# Altium PCB OFP_MCM_v1.5.PcbDoc (part 5 of 8)
Units mm, origin at the board's own origin, x right, y up, seen from the top; angles counter-clockwise.
Board outline 110 x 120 mm, 4 copper layers (Top Layer, Layer 1, Layer 2, Bottom Layer), stack 1.576 mm thick; 353 components, 268 nets, 1240 pads, 519 vias.
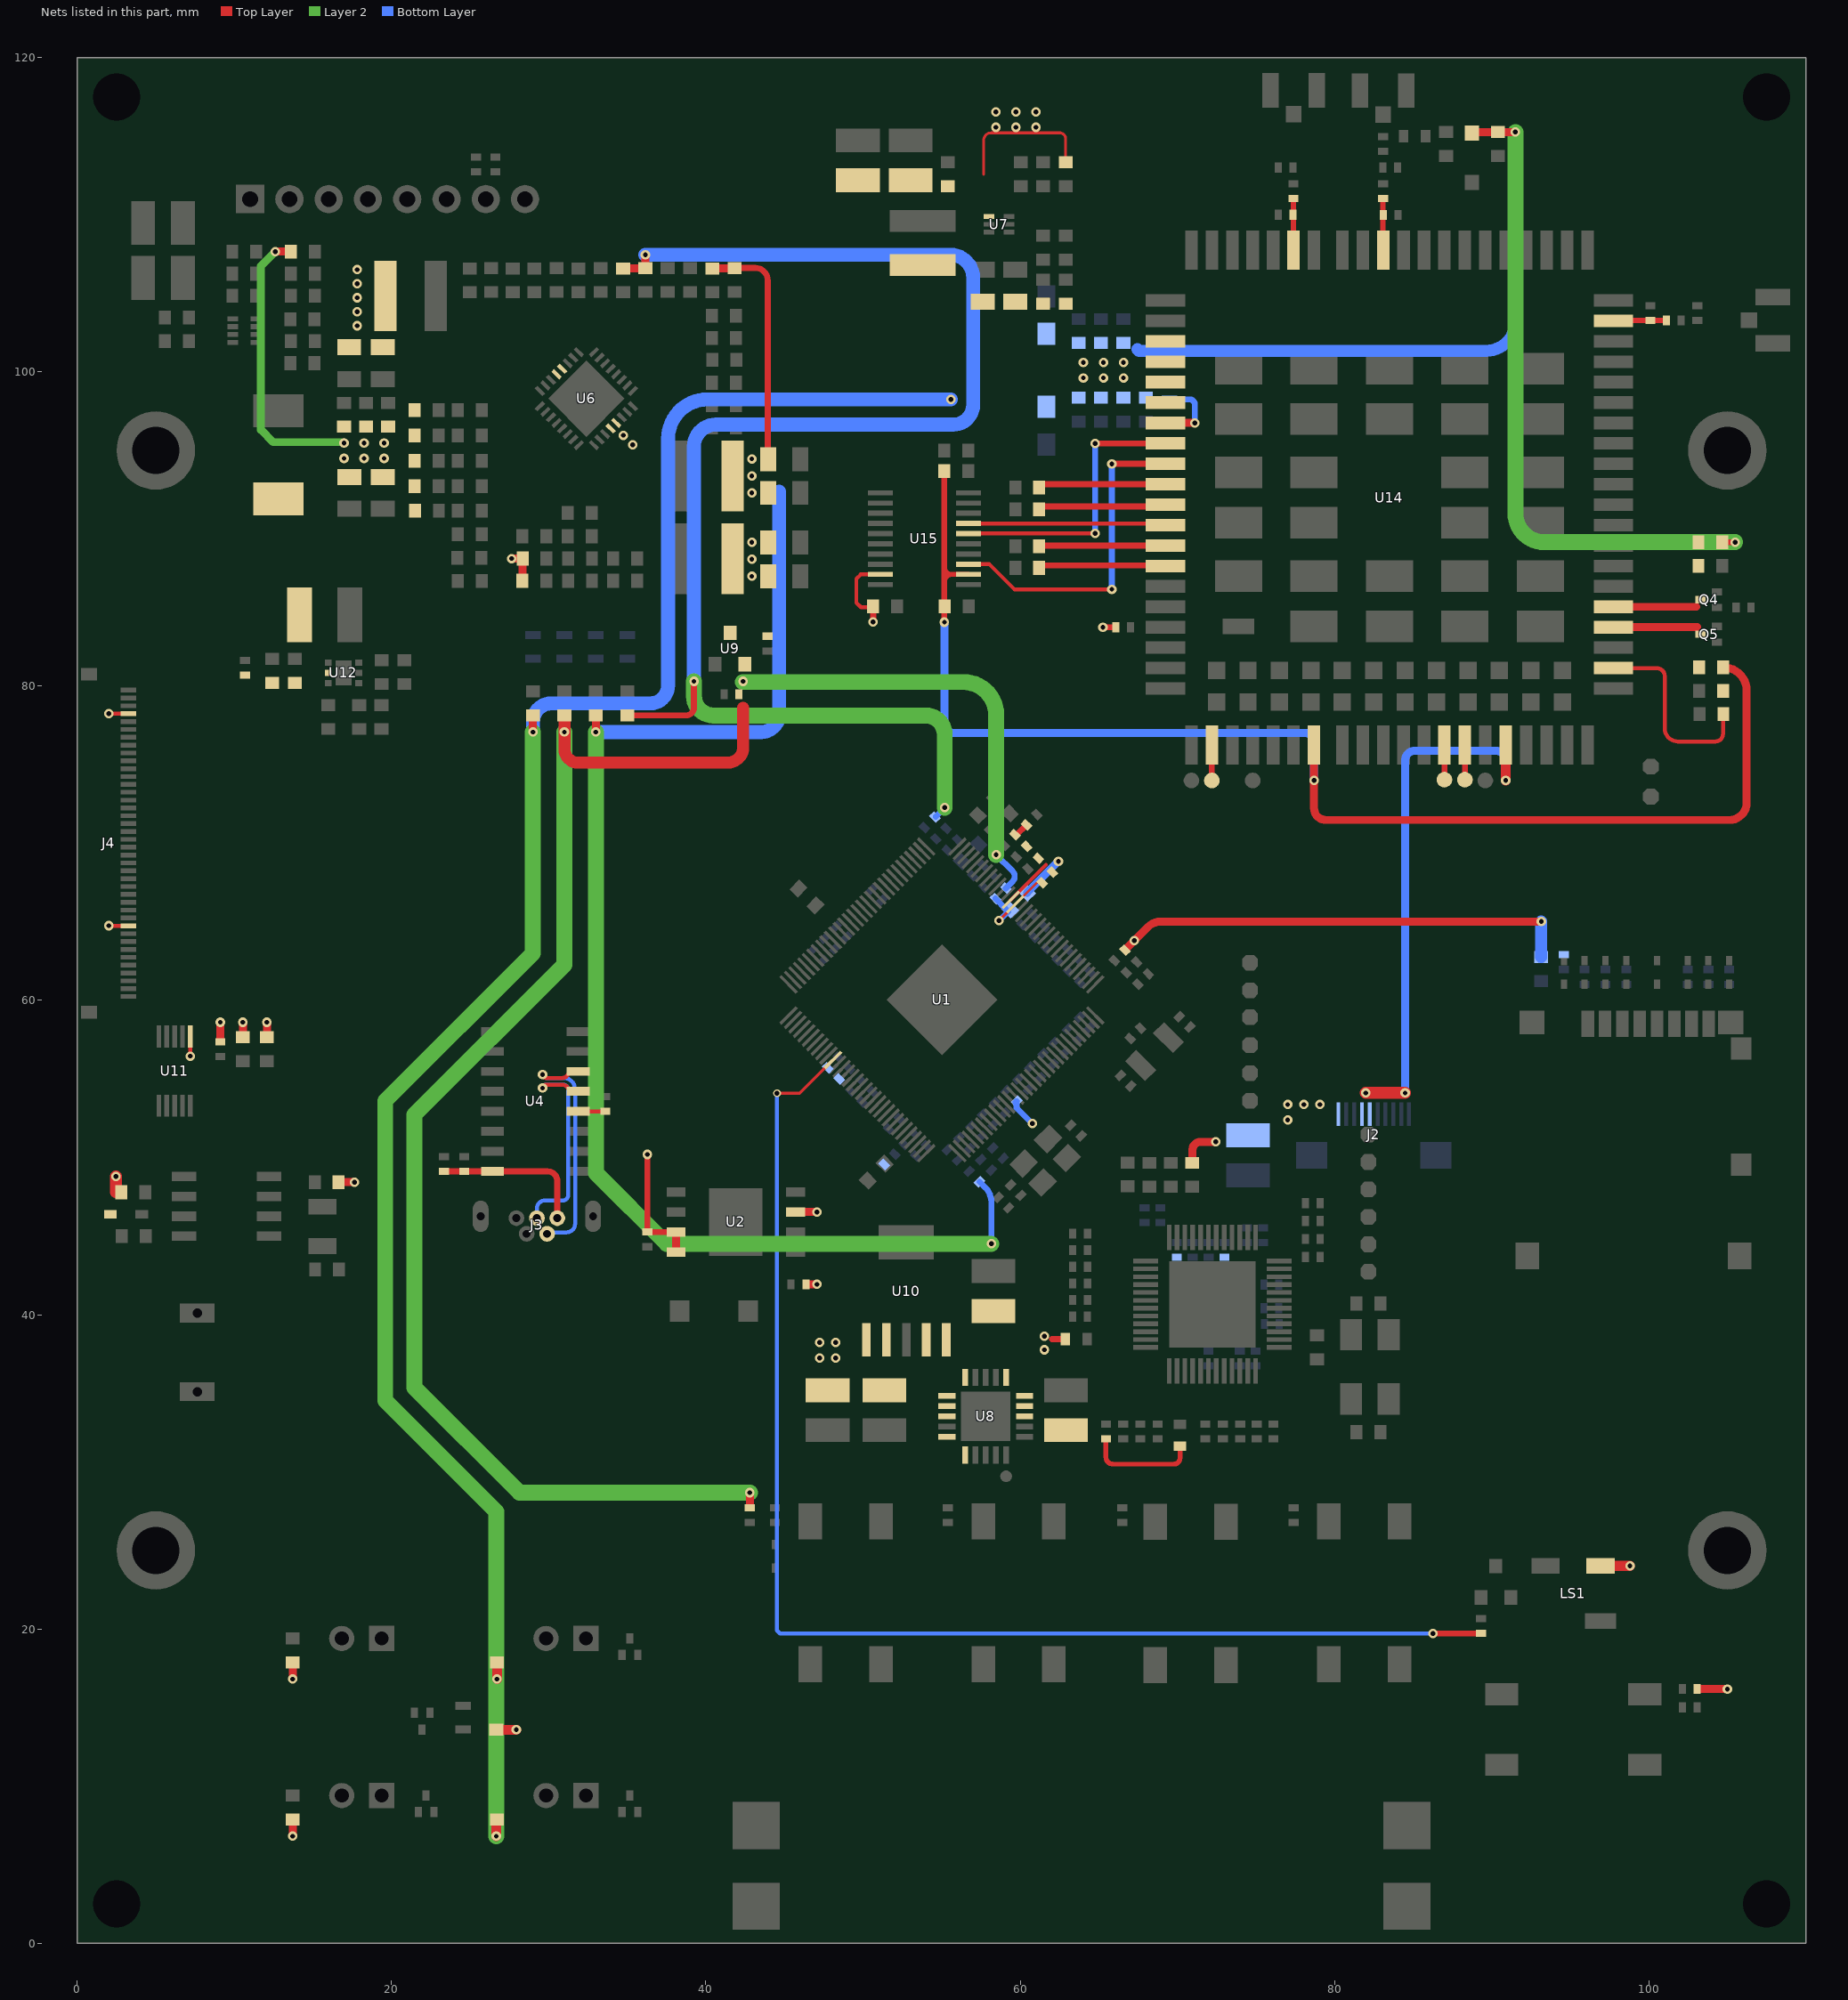
[diagram p4: the nets of this part, all layers, seen from the top]

## Part data (continued)
R74 R75 R76: library part RC0603FR-0751KL, "RES 51K OHM 1% 1/10W 0603", Case Code (Imperial)=0603, Case Code (Metric)=1608, LCSC Part Number=C107231, Manufacturer=Yageo, Max Operating Temperature=155°C, Max Power Dissipation=100mW, Min Operating Temperature=-55°C, Package Quantity=1, Resistance Tolerance=1%, Resistor Type="Thick Film", Temperature Coefficient=100ppm/°C, Voltage Rating=50V, Case/Package=0603, ComponentLink1Description=https://datasheet.ciiva.com/11819/0900766b80f96399-11819378.pdf?src-supplier=Rs, ComponentLink1URL=https://datasheet.ciiva.com/11819/0900766b80f96399-11819378.pdf?src-supplier=Rs, ComponentLink2Description=https://datasheet.ciiva.com/46395/443971-46395014.pdf?src-supplier=Element14, ComponentLink2URL=https://datasheet.ciiva.com/46395/443971-46395014.pdf?src-supplier=Element14, ComponentLink3Description=https://datasheet.ciiva.com/2454/pyu-r-int-thick-7-2454124.pdf?src-supplier=Digikey, ComponentLink3URL=https://datasheet.ciiva.com/2454/pyu-r-int-thick-7-2454124.pdf?src-supplier=Digikey, ComponentLink4Description=https://datasheet.ciiva.com/2454/pyu-r-int-thick-7-2454125.pdf?src-supplier=Digikey, ComponentLink4URL=https://datasheet.ciiva.com/2454/pyu-r-int-thick-7-2454125.pdf?src-supplier=Digikey, ComponentLink5Description=https://datasheet.ciiva.com/2454/pyu-r-int-thick-7-2454123.pdf?src-supplier=Digikey, ComponentLink5URL=https://datasheet.ciiva.com/2454/pyu-r-int-thick-7-2454123.pdf?src-supplier=Digikey, ComponentLink6Description=https://datasheet.ciiva.com/12558/rc0603-272842-12558554.pdf?src-supplier=Mouser, ComponentLink6URL=https://datasheet.ciiva.com/12558/rc0603-272842-12558554.pdf?src-supplier=Mouser, Depth=0.8mm, Features="Moisture Resistant", Height=0.45mm, Item Type=Resistors, Lead Free=5697LeadFree, Length=1.6mm, Manufacturer Part Number=RC0603FR-0751KL, Number of Terminations=2, Packaging="Tape and Reel", Pins=2NUMBER, Power Rating=100mW, Pricing="5000=0.0024, 50000=0.0023, 150000=0.0022, 375000=0.0021, 1000000=0.002 (USD)", Reach SVHC Compliant=No, RoHS=Yes, RoHS Compliant=Yes, Series=RC, Stock=1155000, Supplier="Future Electronics", Technology="THICK FILM", Termination=SMD/SMT, Tolerance=1%, Voltage Rating (DC)=50V, Width=0.031inch
R77 R97 R98 R99 R114 R120 R121: library part RC0603FR-07680RL, "RES SMD 680 OHM 1% 1/10W 0603", LCSC Part Number=C112310, Manufacturer=Yageo, Package=0603, ComponentLink4Description=LCSC, ComponentLink4URL=https://www.lcsc.com/product-detail/Chip-Resistor-Surface-Mount_YAGEO-RC0603FR-07680RL_C112310.html, Item Type=Resistor, Manufacturer Part Number=RC0603FR-07680RL
R78: library part RC0603FR-07820RL, "RES 820 OHM 1% 1/10W 0603", Case Code (Imperial)=0603, Case Code (Metric)=1608, LCSC Part Number=C114638, Manufacturer=Yageo, Max Operating Temperature=155°C, Max Power Dissipation=100mW, Min Operating Temperature=-55°C, Resistance Tolerance=1%, Resistor Type="Thick Film", Supplier Part Number 1=8621260, Temperature Coefficient=100ppm/°C, Voltage Rating=75V, Voltage Rating (DC)=50V, Case/Package=0603, Category="Chip SMD Resistors", ComponentLink1Description=http://www.farnell.com/datasheets/1868787.pdf?src-supplier=Farnell, ComponentLink1URL=http://www.farnell.com/datasheets/1868787.pdf?src-supplier=Farnell, ComponentLink2Description=http://www.mouser.com/ds/2/447/RC0603-272842.pdf?src-supplier=Mouser, ComponentLink2URL=http://www.mouser.com/ds/2/447/RC0603-272842.pdf?src-supplier=Mouser, ComponentLink3Description=http://www.farnell.com/datasheets/2167052.pdf?src-supplier=Farnell, ComponentLink3URL=http://www.farnell.com/datasheets/2167052.pdf?src-supplier=Farnell, ComponentLink4Description=https://www.verical.com/server-webapp/html/getDatasheet?partID=358925&src-supplier=Verical, ComponentLink4URL=https://www.verical.com/server-webapp/html/getDatasheet?partID=358925&src-supplier=Verical, ComponentLink5Description=http://www.farnell.com/datasheets/1868787.pdf?src-supplier=Newark, ComponentLink5URL=http://www.farnell.com/datasheets/1868787.pdf?src-supplier=Newark, ComponentLink6Description=http://www.farnell.com/datasheets/1868787.pdf?src-supplier=Element14, ComponentLink6URL=http://www.farnell.com/datasheets/1868787.pdf?src-supplier=Element14, ComponentLink7Description=http://www.yageo.com/documents/recent/PYu-RC_Group_51_RoHS_L_10.pdf?src-supplier=Digi-Key, ComponentLink7URL=http://www.yageo.com/documents/recent/PYu-RC_Group_51_RoHS_L_10.pdf?src-supplier=Digi-Key, ComponentLink8Description=http://www.yageo.com/documents/recent/PYu-RC_Group_51_RoHS_L_9.pdf?src-supplier=Digi-Key, ComponentLink8URL=http://www.yageo.com/documents/recent/PYu-RC_Group_51_RoHS_L_9.pdf?src-supplier=Digi-Key, ComponentLink9Description=http://www.farnell.com/datasheets/2167052.pdf?src-supplier=Newark, ComponentLink9URL=http://www.farnell.com/datasheets/2167052.pdf?src-supplier=Newark, ComponentLink10Description=http://www.yageo.com/documents/recent/PYu-RC0603_51_RoHS_L_7.pdf?src-supplier=Future+Electronics, ComponentLink10URL=http://www.yageo.com/documents/recent/PYu-RC0603_51_RoHS_L_7.pdf?src-supplier=Future+Electronics, Construction=Rectangular, Depth=0.8mm, Features="Moisture Resistant", Height=0.45mm, Item Type=Resistor, Lead Free="Lead Free", Length=1.6mm, Manufacturer Part Number=RC0603FR-07820RL, Military Standard=Not, Number of Terminations=2, Packaging="Tape and Reel", Pins=2, Power Rating=100mW, Pricing 1="5000=0.002, 50000=0.0014, 100000=0.0018, 200000=0.0014, 375000=0.0018, 625000=0.0013, 1000000=0.0017, 2000000=0.0012, 3750000=0.0016 (USD)", Reach SVHC Compliant=Unknown, RoHS=Yes, RoHS Compliant=Yes, Series=RC, Stock 1=415000, Supplier 1="Future Electronics", Technology="THICK FILM", Termination=SMD/SMT, Tolerance=1%, Weight=7.1E-05oz, Width=0.8mm
R79: library part RC0603FR-07499RL, "RES 499 OHM 1% 1/10W 0603", Case Code (Imperial)=0603, Case Code (Metric)=1608, LCSC Part Number=C137714, Manufacturer=Yageo, Max Operating Temperature=155°C, Max Power Dissipation=100mW, Min Operating Temperature=-55°C, Package Quantity=1, Resistor Type="Thick Film", Supplier Part Number 1=1995585, Temperature Coefficient=100ppm/°C, Tolerance=1%, Voltage Rating=50V, Case/Package=0603, Category="Chip SMD Resistors", ComponentLink1Description=https://datasheet.ciiva.com/11808/0900766b80f96399-11808558.pdf?src-supplier=RSComponents, ComponentLink1URL=https://datasheet.ciiva.com/11808/0900766b80f96399-11808558.pdf?src-supplier=RSComponents, ComponentLink2Description=https://datasheet.ciiva.com/2453/pyu-r-int-thick-7-2453956.pdf?src-supplier=Digi-Key, ComponentLink2URL=https://datasheet.ciiva.com/2453/pyu-r-int-thick-7-2453956.pdf?src-supplier=Digi-Key, ComponentLink3Description=https://datasheet.ciiva.com/2453/pyu-r-int-thick-7-2453957.pdf?src-supplier=Digi-Key, ComponentLink3URL=https://datasheet.ciiva.com/2453/pyu-r-int-thick-7-2453957.pdf?src-supplier=Digi-Key, ComponentLink4Description=https://datasheet.ciiva.com/2453/pyu-r-int-thick-7-2453955.pdf?src-supplier=Digi-Key, ComponentLink4URL=https://datasheet.ciiva.com/2453/pyu-r-int-thick-7-2453955.pdf?src-supplier=Digi-Key, ComponentLink5Description=https://datasheet.ciiva.com/12558/rc0603-272842-12558391.pdf?src-supplier=Mouser, ComponentLink5URL=https://datasheet.ciiva.com/12558/rc0603-272842-12558391.pdf?src-supplier=Mouser, ComponentLink6Description=https://datasheet.ciiva.com/8885/pyu-rc0603-51-rohs-l-4-8885483.pdf?src-supplier=Avnet, ComponentLink6URL=https://datasheet.ciiva.com/8885/pyu-rc0603-51-rohs-l-4-8885483.pdf?src-supplier=Avnet, Construction=Rectangular, Contact Plating=Tin,Matte, Depth=0.8mm, Features="Moisture Resistant", Height=0.45mm, Lead Free="Lead Free", Length=1.6mm, Manufacturer Part Number=RC0603FR-07499RL, Military Standard=Not, Mount="Surface Mount", Number of Terminations=2, Packaging="Tape and Reel", Power Rating=100mW, Pricing 1="5000=0.00300, 10000=0.00300, 15000=0.00300, 20000=0.00200 (GBP)", Radiation Hardening=No, Resistance=499R, RoHS=Yes, RoHS Compliant=Yes, Series=RC, Size Code=0603, Stock 1=900, Supplier 1=RSComponents, Technology="THICK FILM", Termination=SMD/SMT, Voltage Rating (DC)=50V, Width=0.031inch
R80: library part RC0603FR-07100RL, "RES SMD 100 OHM 1% 1/10W 0603", Case Code (Imperial)=0603, Case Code (Metric)=1608, LCSC Part Number=C105588, Manufacturer=Yageo, Max Operating Temperature=155°C, Max Power Dissipation=100mW, Min Operating Temperature=-55°C, Resistance Tolerance=1%, Resistor Type="Thick Film", Temperature Coefficient=100ppm/°C, Voltage Rating=50V, Case/Package=0603, Category="Chip SMD Resistors", Construction=Rectangular, Depth=0.8mm, Features="Moisture Resistant", Height=0.45mm, Item Type=Resistor, Lead Free="Lead Free", Length=1.6mm, Manufacturer Part Number=RC0603FR-07100RL, Military Standard=Not, Number of Pins=2, Number of Terminations=2, Packaging="Tape and Reel", Power Rating=100mW, Pricing 1="5000=0.00300, 5000=0.00200, 5000=0.00450, 50000=0.00410, 500000=0.00230, 2500000=0.00140 (USD)", REACH SVHC=Unknown, Resistance=100R, RoHS=Yes, RoHS Compliant=Yes, Series=RC, Size Code=0603, Stock 1=3800000, Supplier 1="Arrow Electronics", Supplier Part Number 1=RC0603FR-07100RL, Technology="THICK FILM", Termination=SMD/SMT, Tolerance=1%, Voltage Rating (DC)=50V, Width=0.8mm
R81 R86: library part RC0603FR-0710RL, "RES SMD 10 OHM 1% 1/10W 0603", Case Code (Imperial)=0603, Case Code (Metric)=1608, LCSC Part Number=C109318, Manufacturer=Yageo, Max Operating Temperature=155°C, Min Operating Temperature=-55°C, Power Rating=100mW, Supplier Part Number 1=311-10.0HRDKR-ND, Temperature Coefficient=200ppm/°C, Tolerance=1%, Voltage Rating=50V, Case/Package=0603, ComponentLink1Description=http://www.farnell.com/datasheets/1868787.pdf?src-supplier=Element14, ComponentLink1URL=http://www.farnell.com/datasheets/1868787.pdf?src-supplier=Element14, ComponentLink2Description=http://www.yageo.com/documents/recent/PYu-RC0603_51_RoHS_L_4.pdf?src-supplier=Avnet, ComponentLink2URL=http://www.yageo.com/documents/recent/PYu-RC0603_51_RoHS_L_4.pdf?src-supplier=Avnet, ComponentLink3Description=http://documents.rs-components.com/techlib://itc_doclist_GB.htm?stockno=5048984&src-supplier=RSComponents, ComponentLink3URL=http://documents.rs-components.com/techlib://itc_doclist_GB.htm?stockno=5048984&src-supplier=RSComponents, ComponentLink4Description=http://www.yageo.com/documents/recent/PYu-RC0603_51_RoHS_L_4.pdf?src-supplier=Avnet+Europe, ComponentLink4URL=http://www.yageo.com/documents/recent/PYu-RC0603_51_RoHS_L_4.pdf?src-supplier=Avnet+Europe, Composition="Thick Film", Contact Plating=Tin,Matte, Depth=0.8mm, Height=0.45mm, Item Type=Resistor, Lead Free="Lead Free", Length=1.6mm, Manufacturer Part Number=RC0603FR-0710RL, Military Standard=Not, Number of Pins=2, Packaging="Tape and Reel", Pricing 1="1=0.1, 10=0.046, 100=0.0187, 1000=0.0084, 2500=0.00729 (USD)", Radiation Hardening=No, REACH SVHC="No SVHC", Resistance=10R, Stock 1=10836596, Supplier 1=Digi-Key, Termination=SMD/SMT, Voltage Rating (DC)=50V, Width=0.8mm
R87: library part RT0402BRE079K53L, "63mW Thin Film Resistor ±50ppm/℃ ±0.1% 9.53kΩ 0402 Chip Resistor - Surface Mount ROHS", Case/Package=0402, LCSC Part Number=C853448, Manufacturer=Yageo, Max Operating Temperature=155°C, Max Power Dissipation=63mW, Min Operating Temperature=-55°C, Temperature Coefficient=50ppm/°C, Tolerance=0.1%, Voltage Rating=50V, ComponentLink1Description=https://datasheet.ciiva.com/2582/pyu-rt-1-to-0-05-rohs-l-5-2582995.pdf?src-supplier=Digikey, ComponentLink1URL=https://datasheet.ciiva.com/2582/pyu-rt-1-to-0-05-rohs-l-5-2582995.pdf?src-supplier=Digikey, Item Type=Resistors, Lead Free="Lead Free", Manufacturer Part Number=RT0402BRE079K53L, Number of Terminations=2, Packaging="Tape and Reel", Pricing="10000=0.074, 20000=0.064, 30000=0.059, 50000=0.052 (USD)", RoHS=Yes, RoHS Compliant=Yes, Series=RT, Supplier=Newark, Voltage Rating (DC)=50V
R88: library part RC0603FR-0790K9L, "RES 90.9K OHM 1% 1/10W 0603", LCSC Part Number=C185305, Manufacturer=Yageo, Voltage Rating (DC)=50V, ComponentLink1Description=https://datasheet.ciiva.com/15189/getdatasheetpartid-325203-15189835.pdf?src-supplier=Verical, ComponentLink1URL=https://datasheet.ciiva.com/15189/getdatasheetpartid-325203-15189835.pdf?src-supplier=Verical, Item Type=Resistors, Lead Free=5697LeadFree, Manufacturer Part Number=RC0603FR-0790K9L, Pricing="5000=0.0022, 50000=0.0021, 150000=0.0021, 375000=0.002, 1000000=0.0019 (USD)", RoHS=Yes, RoHS Compliant=5897YesNo, Stock=100000, Supplier="Future Electronics"
R93: library part RC0603FR-071ML, "RES SMD 1M OHM 1% 1/10W 0603", Case Code (Imperial)=0603, Case Code (Metric)=1608, LCSC Part Number=C105578, Manufacturer=Yageo, Max Operating Temperature=155°C, Min Operating Temperature=-55°C, Package Quantity=5000, Power Rating=100mW, Resistance=1MR, Supplier Part Number 1=311-1.00MHRDKR-ND, Temperature Coefficient=100ppm/°C, Tolerance=1%, Voltage Rating=50V, Case/Package=0603, ComponentLink1Description=http://www.farnell.com/datasheets/2167052.pdf?src-supplier=Mouser, ComponentLink1URL=http://www.farnell.com/datasheets/2167052.pdf?src-supplier=Mouser, ComponentLink2Description=http://www.farnell.com/datasheets/2167052.pdf?src-supplier=Element14, ComponentLink2URL=http://www.farnell.com/datasheets/2167052.pdf?src-supplier=Element14, ComponentLink3Description=http://documents.rs-components.com/techlib://itc_doclist_GB.htm?stockno=5048956&src-supplier=RSComponents, ComponentLink3URL=http://documents.rs-components.com/techlib://itc_doclist_GB.htm?stockno=5048956&src-supplier=RSComponents, Composition="Thick Film", Depth=0.8mm, Height=0.45mm, Item Type=Resistor, Lead Free="Lead Free", Length=1.6mm, Manufacturer Part Number=RC0603FR-071ML, Military Standard=Not, Number of Pins=2, Packaging="Tape and Reel", Pricing 1="1=0.1, 10=0.023, 100=0.0094, 1000=0.00421, 2500=0.00366 (USD)", REACH SVHC="No SVHC", Stock 1=3824601, Supplier 1=Digi-Key, Termination=SMD/SMT, Voltage Rating (DC)=50V, Width=0.8mm
R95 R103: library part RC0603FR-071KL, "RES SMD 1K OHM 1% 1/10W 0603", Case Code (Imperial)=0603, Case Code (Metric)=1608, LCSC Part Number=C22548, Manufacturer=Yageo, Max Operating Temperature=155°C, Min Operating Temperature=-55°C, Power Rating=100mW, Resistance=1kR, Supplier Part Number 1=311-1.00KHRDKR-ND, Temperature Coefficient=100ppm/°C, Tolerance=1%, Voltage Rating=50V, Case/Package=0603, ComponentLink1Description=https://www.verical.com/server-webapp/html/getDatasheet?partID=409289&src-supplier=Verical, ComponentLink1URL=https://www.verical.com/server-webapp/html/getDatasheet?partID=409289&src-supplier=Verical, ComponentLink2Description=http://documents.rs-components.com/techlib://itc_doclist_GB.htm?stockno=5048928&src-supplier=RSComponents, ComponentLink2URL=http://documents.rs-components.com/techlib://itc_doclist_GB.htm?stockno=5048928&src-supplier=RSComponents, ComponentLink3Description=http://www.yageo.com/documents/recent/PYu-RC0603_51_RoHS_L_4.pdf?src-supplier=Avnet+Europe, ComponentLink3URL=http://www.yageo.com/documents/recent/PYu-RC0603_51_RoHS_L_4.pdf?src-supplier=Avnet+Europe, ComponentLink4Description=http://www.farnell.com/datasheets/2167052.pdf?src-supplier=Element14, ComponentLink4URL=http://www.farnell.com/datasheets/2167052.pdf?src-supplier=Element14, ComponentLink5Description=http://www.farnell.com/datasheets/1868787.pdf?src-supplier=Element14, ComponentLink5URL=http://www.farnell.com/datasheets/1868787.pdf?src-supplier=Element14, ComponentLink6Description=http://www.yageo.com/documents/recent/PYu-RC_Group_51_RoHS_L_2.pdf?src-supplier=Avnet, ComponentLink6URL=http://www.yageo.com/documents/recent/PYu-RC_Group_51_RoHS_L_2.pdf?src-supplier=Avnet, ComponentLink7Description=https://www.verical.com/server-webapp/html/getDatasheet?partID=404327&src-supplier=Verical, ComponentLink7URL=https://www.verical.com/server-webapp/html/getDatasheet?partID=404327&src-supplier=Verical, ComponentLink8Description=http://www.farnell.com/datasheets/443971.pdf?src-supplier=Element14, ComponentLink8URL=http://www.farnell.com/datasheets/443971.pdf?src-supplier=Element14, Composition="Thick Film", Contact Plating=Tin,Matte, Depth=0.8mm, Height=0.45mm, Item Type=Resistor, Lead Free="Lead Free", Length=1.6mm, Manufacturer Part Number=RC0603FR-071KL, Military Standard=Not, Packaging="Tape and Reel", Pricing 1="1=0.1, 10=0.023, 100=0.0094, 1000=0.0042, 2500=0.0037 (USD)", Radiation Hardening=No, REACH SVHC="No SVHC", Stock 1=21472395, Supplier 1=Digi-Key, Termination=SMD/SMT
R102: library part RC0603FR-0747KL, "RES 47K OHM 1% 1/10W 0603", Case Code (Imperial)=0603, Case Code (Metric)=1608, LCSC Part Number=C105579, Manufacturer=Yageo, Max Operating Temperature=155°C, Max Power Dissipation=100mW, Min Operating Temperature=-55°C, Package Quantity=1, Resistance Tolerance=1%, Resistor Type="Thick Film", Temperature Coefficient=100ppm/°C, Voltage Rating=50V, Case/Package=0603, Depth=0.8mm, Features="Moisture Resistant", Height=0.022inch, Item Type=Resistors, Lead Free=5697LeadFree, Length=0.063inch, Manufacturer Part Number=RC0603FR-0747KL, Number of Terminations=2, Packaging="Tape and Reel", Pins=2, Power Rating=100mW, Pricing="100=0.078, 1000=0.071, 2500=0.068, 5000=0.062, 10000=0.057 (SEK)", Radiation Hardening=5898YesNo, Reach SVHC Compliant=Unknown, RoHS=Yes, RoHS Compliant=Yes, Series=RC, Stock=3100, Supplier=Rs, Technology="THICK FILM", Termination=SMD/SMT, Tolerance=1%, Voltage Rating (AC)=50V, Voltage Rating (DC)=50V, Width=0.031inch
R105 R106 R107 R108: library part RC0603FR-0722RL, "RES 22 OHM 1% 1/10W 0603", Case Code (Imperial)=0603, Case Code (Metric)=1608, LCSC Part Number=C107701, Manufacturer=Yageo, Max Operating Temperature=155°C, Max Power Dissipation=100mW, Min Operating Temperature=-55°C, Package Quantity=1, Resistance Tolerance=1%, Resistor Type="Thick Film", Temperature Coefficient=100ppm/°C, Voltage Rating=50V, Case/Package=0603, Category="Chip SMD Resistors", ComponentLink1Description=https://datasheet.ciiva.com/11819/0900766b80f96399-11819285.pdf?src-supplier=RSComponents, ComponentLink1URL=https://datasheet.ciiva.com/11819/0900766b80f96399-11819285.pdf?src-supplier=RSComponents, ComponentLink2Description=https://datasheet.ciiva.com/46395/443971-46395032.pdf?src-supplier=Element14, ComponentLink2URL=https://datasheet.ciiva.com/46395/443971-46395032.pdf?src-supplier=Element14, ComponentLink3Description=https://datasheet.ciiva.com/46440/1868787-46440901.pdf?src-supplier=Element14, ComponentLink3URL=https://datasheet.ciiva.com/46440/1868787-46440901.pdf?src-supplier=Element14, ComponentLink4Description=https://datasheet.ciiva.com/2454/pyu-r-int-thick-7-2454355.pdf?src-supplier=Digi-Key, ComponentLink4URL=https://datasheet.ciiva.com/2454/pyu-r-int-thick-7-2454355.pdf?src-supplier=Digi-Key, ComponentLink5Description=https://datasheet.ciiva.com/2454/pyu-r-int-thick-7-2454356.pdf?src-supplier=Digi-Key, ComponentLink5URL=https://datasheet.ciiva.com/2454/pyu-r-int-thick-7-2454356.pdf?src-supplier=Digi-Key, ComponentLink6Description=https://datasheet.ciiva.com/2454/pyu-r-int-thick-7-2454354.pdf?src-supplier=Digi-Key, ComponentLink6URL=https://datasheet.ciiva.com/2454/pyu-r-int-thick-7-2454354.pdf?src-supplier=Digi-Key, Construction=Rectangular, Depth=0.8mm, Features="Moisture Resistant", Height=0.022inch, Item Type=Resistor, Lead Free="Lead Free", Length=0.063inch, Manufacturer Part Number=RC0603FR-0722RL, Military Standard=Not, Number of Pins=2, Number of Terminations=2, Packaging="Tape and Reel", Power Rating=100mW, Pricing 1="5000=0.00133, 10000=0.00131, 20000=0.00127 (USD)", Reach SVHC Compliant=Yes, Resistance=22R, RoHS=Yes, RoHS Compliant=Yes, Series=RC, Size Code=0603, Stock 1=190000, Supplier 1=Avnet, Supplier Part Number 1=RC0603FR-0722RL, Technology="THICK FILM", Termination=SMD/SMT, Tolerance=1%, Voltage Rating (DC)=50V, Width=0.031inch
R111: library part RC0603FR-074K7L, "RES SMD 4.7K OHM 1% 1/10W 0603", LCSC Part Number=C99782, Manufacturer=Yageo, Package=0603, ComponentLink7Description=LCSC, ComponentLink7URL=https://www.lcsc.com/product-detail/Chip-Resistor-Surface-Mount_YAGEO-RC0603FR-074K7L_C99782.html, Item Type=Resistor, Manufacturer Part Number=RC0603FR-074K7L
R112: library part RC0603FR-0710RL, "RES SMD 10 OHM 1% 1/10W 0603", Case Code (Imperial)=0603, Case Code (Metric)=1608, LCSC Part Number=C109318, Manufacturer=Yageo, Max Operating Temperature=155°C, Min Operating Temperature=-55°C, Power Rating=100mW, Resistance=10R, Supplier Part Number 1=311-10.0HRDKR-ND, Temperature Coefficient=200ppm/°C, Tolerance=1%, Voltage Rating=50V, Case/Package=0603, ComponentLink1Description=http://www.farnell.com/datasheets/1868787.pdf?src-supplier=Element14, ComponentLink1URL=http://www.farnell.com/datasheets/1868787.pdf?src-supplier=Element14, ComponentLink2Description=http://www.yageo.com/documents/recent/PYu-RC0603_51_RoHS_L_4.pdf?src-supplier=Avnet, ComponentLink2URL=http://www.yageo.com/documents/recent/PYu-RC0603_51_RoHS_L_4.pdf?src-supplier=Avnet, ComponentLink3Description=http://documents.rs-components.com/techlib://itc_doclist_GB.htm?stockno=5048984&src-supplier=RSComponents, ComponentLink3URL=http://documents.rs-components.com/techlib://itc_doclist_GB.htm?stockno=5048984&src-supplier=RSComponents, ComponentLink4Description=http://www.yageo.com/documents/recent/PYu-RC0603_51_RoHS_L_4.pdf?src-supplier=Avnet+Europe, ComponentLink4URL=http://www.yageo.com/documents/recent/PYu-RC0603_51_RoHS_L_4.pdf?src-supplier=Avnet+Europe, Composition="Thick Film", Contact Plating=Tin,Matte, Depth=0.8mm, Height=0.45mm, Item Type=Resistor, Lead Free="Lead Free", Length=1.6mm, Manufacturer Part Number=RC0603FR-0710RL, Military Standard=Not, Number of Pins=2, Packaging="Tape and Reel", Pricing 1="1=0.1, 10=0.046, 100=0.0187, 1000=0.0084, 2500=0.00729 (USD)", Radiation Hardening=No, REACH SVHC="No SVHC", Stock 1=10836596, Supplier 1=Digi-Key, Termination=SMD/SMT, Voltage Rating (DC)=50V, Width=0.8mm
R113 R119: library part RC0402FR-070RL, "RES 0 OHM JUMPER 1/16W 0402", Case Code (Imperial)=0402, Case Code (Metric)=1005, LCSC Part Number=C106231, Manufacturer=Yageo, Max Operating Temperature=155°C, Max Power Dissipation=63mW, Min Operating Temperature=-55°C, Power Rating=62.5mW, Resistance=0R, Resistor Type="Thick Film", Supplier Part Number 1=603-RC0402FR-070RL, Temperature Coefficient=200ppm/°C, Tolerance=1%, Voltage Rating=50V, Case/Package=0402, ComponentLink1Description=https://datasheet.ciiva.com/8896/pyu-rc0402-51-rohs-l-6-8896149.pdf?src-supplier=Avnet, ComponentLink1URL=https://datasheet.ciiva.com/8896/pyu-rc0402-51-rohs-l-6-8896149.pdf?src-supplier=Avnet, ComponentLink2Description=https://datasheet.ciiva.com/16790/pyu-rc0402-51-rohs-l-6-r-16790444.pdf?src-supplier=Future+Electronics, ComponentLink2URL=https://datasheet.ciiva.com/16790/pyu-rc0402-51-rohs-l-6-r-16790444.pdf?src-supplier=Future+Electronics, Contact Plating=Tin,Matte, Features="Moisture Resistant", Height=0.35mm, Item Type=Resistors, Lead Free="Lead Free", Length=1mm, Manufacturer Part Number=RC0402FR-070RL, Mount="Surface Mount", Number of Terminations=2, Packaging="Tape and Reel", Pricing 1="1=0.10000, 10=0.01400, 50=0.01400, 100=0.00600, 1000=0.00300, 5000=0.00200, 10000=0.00100 (USD)", Radiation Hardening=No, RoHS=Yes, RoHS Compliant=Yes, Series=RC, Size Code=0402, Stock 1=8556842, Supplier 1=Mouser, Termination=SMD/SMT, Width=0.5mm
R122: library part RC0402JR-0710ML, "RES SMD 10M Ohm 5% 1/16W 0402", Case Code (Imperial)=0402, Case Code (Metric)=1005, LCSC Part Number=C274900, Manufacturer=Yageo, Max Operating Temperature=155°C, Max Power Dissipation=63mW, Min Operating Temperature=-55°C, Package Quantity=1, Power Rating=62.5mW, Resistance=10MR, Resistance Tolerance=5%, Resistor Type="Thick Film", Supplier Part Number 1=311-10MJRCT-ND, Temperature Coefficient=100ppm/°C, Voltage Rating=50V, Case/Package=0402, Category="Chip SMD Resistors", ComponentLink1Description=https://datasheet.ciiva.com/7983/1018594-7983541.pdf?src-supplier=Element14, ComponentLink1URL=https://datasheet.ciiva.com/7983/1018594-7983541.pdf?src-supplier=Element14, ComponentLink2Description=https://datasheet.ciiva.com/2518/pyu-r-int-thick-7-2518904.pdf?src-supplier=Digi-Key, ComponentLink2URL=https://datasheet.ciiva.com/2518/pyu-r-int-thick-7-2518904.pdf?src-supplier=Digi-Key, ComponentLink3Description=https://datasheet.ciiva.com/2518/pyu-r-int-thick-7-2518905.pdf?src-supplier=Digi-Key, ComponentLink3URL=https://datasheet.ciiva.com/2518/pyu-r-int-thick-7-2518905.pdf?src-supplier=Digi-Key, ComponentLink4Description=https://datasheet.ciiva.com/2518/pyu-r-int-thick-7-2518906.pdf?src-supplier=Digi-Key, ComponentLink4URL=https://datasheet.ciiva.com/2518/pyu-r-int-thick-7-2518906.pdf?src-supplier=Digi-Key, ComponentLink5Description=https://datasheet.ciiva.com/12577/pyu-rc0402-51-rohs-l-6-r-12577774.pdf?src-supplier=Mouser, ComponentLink5URL=https://datasheet.ciiva.com/12577/pyu-rc0402-51-rohs-l-6-r-12577774.pdf?src-supplier=Mouser, Construction=Rectangular, Depth=0.5mm, Features="Moisture Resistant", Height=0.016inch, Lead Free="Lead Free", Length=1mm, Manufacturer Part Number=RC0402JR-0710ML, Military Standard=Not, Number of Pins=2, Number of Terminations=2, Packaging="Tape and Reel", Pricing 1="1=0.10000, 10=0.01300, 100=0.00540, 1000=0.00244, 2500=0.00212, 5000=0.00175 (USD)", REACH SVHC="No SVHC", RoHS=Yes, RoHS Compliant=Yes, Series=RC, Size Code=0402, Stock 1=38636, Supplier 1=Digi-Key, Termination=SMD/SMT, Tolerance=5%, Voltage Rating (DC)=50V, Weight=2.3E-05oz, Width=0.02inch
SW1: "SWITCH TACTILE SPST-NO 0.05A 24V", LCSC Part Number=C6558197, Manufacturer="TE Connectivity Alcoswitch", ComponentLink1Description=https://datasheet.ciiva.com/7097/1486952-7097325.pdf?src-supplier=Newark, ComponentLink1URL=https://datasheet.ciiva.com/7097/1486952-7097325.pdf?src-supplier=Newark, ComponentLink2Description=https://datasheet.ciiva.com/1530/1714712-1530976.pdf?src-supplier=Element14, ComponentLink2URL=https://datasheet.ciiva.com/1530/1714712-1530976.pdf?src-supplier=Element14, ComponentLink3Description=https://datasheet.ciiva.com/15184/getdatasheetpartid-167889-15184443.pdf?src-supplier=Verical, ComponentLink3URL=https://datasheet.ciiva.com/15184/getdatasheetpartid-167889-15184443.pdf?src-supplier=Verical, ComponentLink4Description=https://datasheet.ciiva.com/8082/eng-cs-1308111-1-switches-core-program-catalog-0308-8082682.pdf?src-supplier=Avnet, ComponentLink4URL=https://datasheet.ciiva.com/8082/eng-cs-1308111-1-switches-core-program-catalog-0308-8082682.pdf?src-supplier=Avnet, Item Type=Switches, Manufacturer Part Number=FSM6JSMATR, Number of Positions=2NUMBER, RoHS=Yes, RoHS Compliant=5897YesNo, Stock=735, Supplier=Rs
SW2: "Without bracket 50mA 4mm 100000 Times 12V 160gf 3mm 2mm Round Button Standing paste SPST SMD Tactile Switches ROHS", LCSC Part Number=C720477, Manufacturer=XUNPU, Package=SMD, ComponentLink1Description=LCSC, ComponentLink1URL=https://www.lcsc.com/product-detail/Tactile-Switches_XUNPU-TS-1088-AR02016_C720477.html?s_z=n_TS-1088-AR02016, Item Type="Tactile Switch", Manufacturer Part Number=TS-1088-AR02016
SW3 SW4 SW5 SW6: "6mm 12mm Round Button 50mA Standing paste 6mm SPST 12V SMD,6x6mm Tactile Switches ROHS", LCSC Part Number=C455124, Manufacturer=XUNPU, Package=SMD,6x6mm, ComponentLink1Description=LCSC, ComponentLink1URL=https://www.lcsc.com/product-detail/Tactile-Switches_XUNPU-TS-1002S-12026C_C455124.html?s_z=n_TS-1002S-12026C, Item Type="Tactile Switch", Manufacturer Part Number=TS-1002S-12026C
TP1 TP2 TP3 TP4 TP5 TP6 TP7 TP8 TP9 TP10 TP11 TP12 TP13 TP14 TP15: "Test Point ON", Item Type="Test Point", Manufacturer Part Number="TEST POINT 0.5mm Dia"
U1: "LQFP-128-EP(14x14) Microcontrollers (MCU/MPU/SOC) ROHS", LCSC Part Number=C2687449, Manufacturer="Allwinner Tech", Package=LQFP-128-EP(14x14), ComponentLink1Description=LCSC, ComponentLink1URL=https://www.lcsc.com/product-detail/Microcontrollers-MCU-MPU-SOC_Allwinner-Tech-V3s_C2687449.html?s_z=n_V3s, Item Type=IC, Manufacturer Part Number=V3s
U2: "IC FLASH 128MBIT SPI/QUAD 8WSON", Frequency=133MHz, LCSC Part Number=C401662, Manufacturer=Winbond, Max Operating Temperature=85°C, Min Operating Temperature=-40°C, ComponentLink1Description=http://www.winbond.com/resource-files/w25q128jv%20revf%2003272018%20plus.pdf?src-supplier=Digikey, ComponentLink1URL=http://www.winbond.com/resource-files/w25q128jv%20revf%2003272018%20plus.pdf?src-supplier=Digikey, Item Type=IC, Manufacturer Part Number=W25Q128JVEIQ, Memory Format=Non-Volatile,FLASH, Memory Size=128Mb, Mounting Technology="Surface Mount", Packaging=Rail/Tube, Pricing="1=1.92, 10=1.701, 25=1.6224, 63=1.54651, 126=1.49183, 252=1.43909, 504=1.38821, 1008=1.33908, 5040=1.23141 (USD)", RoHS=Yes, RoHS Compliant=Yes, Series=SpiFlash®, Stock=12733, Supplier=Digikey
U3: "IC RTC CLOCK/CALENDAR I2C 8SO", LCSC Part Number=C7440, Manufacturer="NXP Semiconductors", ComponentLink1Description=https://datasheet.ciiva.com/8145/pcf8563-8145180.pdf?src-supplier=Avnet, ComponentLink1URL=https://datasheet.ciiva.com/8145/pcf8563-8145180.pdf?src-supplier=Avnet, ComponentLink2Description=https://datasheet.ciiva.com/1238/pcf8563-1238727.pdf?src-supplier=Digikey, ComponentLink2URL=https://datasheet.ciiva.com/1238/pcf8563-1238727.pdf?src-supplier=Digikey, ComponentLink3Description=https://datasheet.ciiva.com/1238/pcf8563-1238728.pdf?src-supplier=Digikey, ComponentLink3URL=https://datasheet.ciiva.com/1238/pcf8563-1238728.pdf?src-supplier=Digikey, ComponentLink4Description=https://datasheet.ciiva.com/1238/pcf8563-1238773.pdf?src-supplier=Digikey, ComponentLink4URL=https://datasheet.ciiva.com/1238/pcf8563-1238773.pdf?src-supplier=Digikey, ComponentLink5Description=https://datasheet.ciiva.com/16287/pcf8563-16287110.pdf?src-supplier=Future+Electronics, ComponentLink5URL=https://datasheet.ciiva.com/16287/pcf8563-16287110.pdf?src-supplier=Future+Electronics, Item Type=IC, Manufacturer Part Number=PCF8563T/5,518, Pricing="1=0.8372, 10=0.6546, 100=0.5322, 500=0.5102, 1000=0.4872, 2500=0.4562, 5000=0.4356, 10000=0.4016, 25000=0.3863 (USD)", RoHS=Yes, Stock=812, Supplier="Arrow Electronics"
U4: "2Mbps Transceiver USB 2.0 SOP-16 USB ICs ROHS", LCSC Part Number=C84681, Manufacturer=WCH, Package=SOP-16, ComponentLink1Description=LCSC, ComponentLink1URL=https://www.lcsc.com/product-detail/USB-ICs_WCH-Jiangsu-Qin-Heng-CH340C_C84681.html, Item Type=IC, Manufacturer Part Number=CH340C
U5: "IC REG BUCK ADJ 3A SOT583", LCSC Part Number=C3200405, Manufacturer="Texas Instruments", Supplier Part Number=595-TPS62933DRLR, Category="Voltage Regulators - Switching", Item Type=IC, Manufacturer Part Number=TPS62933DRLR, Pricing="1=0.7, 10=0.581, 50=0.581, 100=0.44, 1000=0.297, 10000=0.241 (USD)", RoHS=No, Stock=5259, Supplier=Mouser
U6: "IC REG BCK ADJ 3A/2A TRPL 32VQFN", LCSC Part Number=C138722, Manufacturer="Texas Instruments", ComponentLink1Description=https://datasheet.ciiva.com/29735/tps65261-1-29735186.pdf?src-supplier=Digikey, ComponentLink1URL=https://datasheet.ciiva.com/29735/tps65261-1-29735186.pdf?src-supplier=Digikey, Item Type=IC, Manufacturer Part Number=TPS65261RHBR, Pricing="1=2.78, 10=1.91, 50=1.91, 100=1.71, 1000=1.52, 10000=1.32 (USD)", RoHS=Yes, Stock=3449, Supplier=Mouser
U7: "IC REG BUCK ADJ 3A SOT563", LCSC Part Number=C1513007, Manufacturer="Texas Instruments", Height=600um, Item Type=IC, Length=1.6mm, Manufacturer Part Number=TPS563202DRLR, Number of Channels=1NUMBER, Pins=6NUMBER, Pricing="1=0.29, 10=0.174, 50=0.174, 100=0.131, 1000=0.125, 10000=0.109 (USD)", RoHS=Yes, Stock=5123, Supplier=Mouser, Thickness=550um, Width=1.2mm
U8: "IC REG LIN POS ADJ 1.5A 20VQFN", LCSC Part Number=C129193, Manufacturer="Texas Instruments", ComponentLink1Description=https://datasheet.ciiva.com/4885/sbvs074j-203573-4885874.pdf?src-supplier=Mouser, ComponentLink1URL=https://datasheet.ciiva.com/4885/sbvs074j-203573-4885874.pdf?src-supplier=Mouser, ComponentLink2Description=https://datasheet.ciiva.com/41462/001015037-da-01-en-ic-reg-ldo-adj-tps74801rgwr-vqfn-20-tid-41462882.pdf?src-supplier=Conrad, ComponentLink2URL=https://datasheet.ciiva.com/41462/001015037-da-01-en-ic-reg-ldo-adj-tps74801rgwr-vqfn-20-tid-41462882.pdf?src-supplier=Conrad, ComponentLink3Description=https://datasheet.ciiva.com/14278/tps74801-14278399.pdf?src-supplier=Avnet, ComponentLink3URL=https://datasheet.ciiva.com/14278/tps74801-14278399.pdf?src-supplier=Avnet, ComponentLink4Description=https://datasheet.ciiva.com/31402/tps74801-31402076.pdf?src-supplier=Farnell, ComponentLink4URL=https://datasheet.ciiva.com/31402/tps74801-31402076.pdf?src-supplier=Farnell, ComponentLink5Description=https://datasheet.ciiva.com/2044/tps74801-2044836.pdf?src-supplier=Digikey, ComponentLink5URL=https://datasheet.ciiva.com/2044/tps74801-2044836.pdf?src-supplier=Digikey, ComponentLink6Description=https://datasheet.ciiva.com/2044/tps74801-2044837.pdf?src-supplier=Digikey, ComponentLink6URL=https://datasheet.ciiva.com/2044/tps74801-2044837.pdf?src-supplier=Digikey, ComponentLink7Description=https://datasheet.ciiva.com/2044/tps74801-2044838.pdf?src-supplier=Digikey, ComponentLink7URL=https://datasheet.ciiva.com/2044/tps74801-2044838.pdf?src-supplier=Digikey, Height=1mm, Item Type=IC, Length=5mm, Manufacturer Part Number=TPS74801RGWR, Pricing="1=1.87, 10=1.33, 50=1.33, 100=1.19, 1000=1.04, 10000=1.03 (USD)", RoHS=Yes, Stock=12482, Supplier=Mouser, Thickness=900um, Width=5mm
U9: "IC REG LINEAR 3V 200MA SOT23", LCSC Part Number=C9972, Manufacturer=Torex, Output Voltage=3V, ComponentLink1Description=https://www.torexsemi.com/file/xc6206/XC6206.pdf?src-supplier=Digikey, ComponentLink1URL=https://www.torexsemi.com/file/xc6206/XC6206.pdf?src-supplier=Digikey, ComponentLink2Description=https://datasheet.octopart.com/XC6206P302MR-G-Torex-datasheet-134531119.pdf?src-supplier=TME, ComponentLink2URL=https://datasheet.octopart.com/XC6206P302MR-G-Torex-datasheet-134531119.pdf?src-supplier=TME, Item Type=IC, Manufacturer Part Number=XC6206P302MR-G, Number of Channels=1NUMBER, Pricing="1=0.68, 10=0.543, 50=0.543, 100=0.417, 1000=0.271, 10000=0.214 (USD)", RoHS=Yes, Stock=15826, Supplier=Mouser
U10: "IC REG LINEAR 3.3V 1.5A SOT223-6", Case/Package=SOT-223-6, Dropout Voltage=300mV, Input Bias Current=1mA, LCSC Part Number=595-TPS7A4533DCQR, Manufacturer="Texas Instruments", Max Operating Temperature=125°C, Max Output current=1.5A, Max Output Voltage=3.3V, Max Supply Voltage=20V, Min Current Limit=1.6A, Min Input Voltage=2.1V, Min Operating Temperature=-40°C, Package Quantity=2500, Accuracy=1%, ComponentLink1Description=https://datasheet.ciiva.com/2046/tps7a4515-2046240.pdf?src-supplier=Digikey, ComponentLink1URL=https://datasheet.ciiva.com/2046/tps7a4515-2046240.pdf?src-supplier=Digikey, ComponentLink2Description=https://datasheet.ciiva.com/29569/tps7a4501-29569717.pdf?src-supplier=Digikey, ComponentLink2URL=https://datasheet.ciiva.com/29569/tps7a4501-29569717.pdf?src-supplier=Digikey, ComponentLink3Description=https://datasheet.ciiva.com/29569/tps7a4501-29569718.pdf?src-supplier=Digikey, ComponentLink3URL=https://datasheet.ciiva.com/29569/tps7a4501-29569718.pdf?src-supplier=Digikey, ComponentLink4Description=https://datasheet.ciiva.com/29569/tps7a4501-29569719.pdf?src-supplier=Digikey, ComponentLink4URL=https://datasheet.ciiva.com/29569/tps7a4501-29569719.pdf?src-supplier=Digikey, Item Type=IC, Lead Free="Lead Free", Manufacturer Part Number=TPS7A4533DCQR, Min Output Voltage=3.3V, Number of Outputs=1, Number of Regulators=1, Output Current=1.5A, Output Type=Fixed, Output Voltage=3.3V, Packaging="Tape and Reel", Pins=6, Polarity=Positive, Pricing="1=3.2, 10=2.35, 50=2.35, 100=2.14, 1000=2, 10000=1.87 (USD)", Quiescent Current=1mA, Radiation Hardening=No, RoHS=Yes, RoHS Compliant=Yes, Series=-, Stock=854, Supplier=Mouser
U11: "MSOP-10 Touch Screen Controllers ROHS", LCSC Part Number=C219024, Manufacturer="Shenzhen Nsiway Tech", Package=MSOP-10, ComponentLink1Description=LCSC, ComponentLink1URL=https://www.lcsc.com/product-detail/Touch-Screen-Controllers_Shenzhen-Nsiway-Tech-NS2009_C219024.html?s_z=n_NS2009, Item Type=IC, Manufacturer Part Number=NS2009
U12: "IC LED DRVR RGLTR PWM 30MA 6WSON", LCSC Part Number=C702280, Manufacturer="Texas Instruments", ComponentLink1Description=https://datasheet.ciiva.com/26932/getdatasheetpartid-782062-26932814.pdf?src-supplier=Verical, ComponentLink1URL=https://datasheet.ciiva.com/26932/getdatasheetpartid-782062-26932814.pdf?src-supplier=Verical, ComponentLink2Description=https://datasheet.ciiva.com/24016/slvsbr3-261171-24016309.pdf?src-supplier=Mouser, ComponentLink2URL=https://datasheet.ciiva.com/24016/slvsbr3-261171-24016309.pdf?src-supplier=Mouser, ComponentLink3Description=https://datasheet.ciiva.com/18569/tps61158-18569084.pdf?src-supplier=Digikey, ComponentLink3URL=https://datasheet.ciiva.com/18569/tps61158-18569084.pdf?src-supplier=Digikey, Item Type=IC, Manufacturer Part Number=TPS61158DRVR, Pricing="1=0.81, 10=0.594, 50=0.594, 100=0.489, 1000=0.446, 10000=0.4 (USD)", RoHS=Yes, Stock=6942, Supplier=Mouser
U13: "IC USB 2.0 2PORT HUB IND 48HTQFP", LCSC Part Number=C2864320, Manufacturer="Texas Instruments", ComponentLink1Description=http://www.ti.com/lit/ds/symlink/tusb4020bi.pdf?src-supplier=Digikey, ComponentLink1URL=http://www.ti.com/lit/ds/symlink/tusb4020bi.pdf?src-supplier=Digikey, ComponentLink2Description=http://www.ti.com/general/docs/suppproductinfo.tsp?distId=10&amp;gotoUrl=http%3A%2F%2Fwww.ti.com%2Flit%2Fgpn%2Ftusb4020bi&src-supplier=Digikey, ComponentLink2URL=http://www.ti.com/general/docs/suppproductinfo.tsp?distId=10&amp;gotoUrl=http%3A%2F%2Fwww.ti.com%2Flit%2Fgpn%2Ftusb4020bi&src-supplier=Digikey, Item Type=IC, Manufacturer Part Number=TUSB4020BIPHPR, Pricing="1=4.5, 10=3.15, 50=3.15, 100=2.85, 1000=2.55, 10000=2.52 (USD)", RoHS=Yes, Stock=2703, Supplier=Mouser
U14: "RF TXRX MOD CELLULARCARD EDGE", Manufacturer="Quectel Wireless Solutions", Supplier Part Number=277-EC21EFA-512-STD, ComponentLink1Description=https://datasheet.octopart.com/EC21EFA-512-STD-Quectel-datasheet-163886073.pdf?src-supplier=SOS+electronic, ComponentLink1URL=https://datasheet.octopart.com/EC21EFA-512-STD-Quectel-datasheet-163886073.pdf?src-supplier=SOS+electronic, Item Type=IC, Manufacturer Part Number=EC21EFA-512-STD, Pricing="1=59.46, 10=47.77, 50=42.24, 100=40.31, 1000=38.16, 10000=38.16 (USD)", RoHS=No, Stock=210, Supplier=Mouser
U15: "IC TRANSLATOR BIDIR 20TSSOP", LCSC Part Number=C17206, Manufacturer="Texas Instruments", Package=20-TSSOP, ComponentLink1Description=LCSC, ComponentLink1URL=https://www.lcsc.com/product-detail/Translators-Level-Shifters_Texas-Instruments-TXS0108EPWR_C17206.html, Item Type=IC, Manufacturer Part Number=TXS0108EPWR
X1: library part 7M24000192, "24MHz Surface Mount Crystal 12pF ±10ppm ±10ppm SMD3225-4P Crystals ROHS", LCSC Part Number=C331579, Manufacturer="TXC Corp", Package=SMD3225-4P, ComponentLink1Description=LCSC, ComponentLink1URL=https://www.lcsc.com/product-detail/Crystals_TXC-Corp-7M24000192_C331579.html, Item Type=Crytal, Manufacturer Part Number=7M24000192
X2 X3: library part CM315D32768DZFT, "CRYSTAL 32.7680KHZ 12.5PF SMD", LCSC Part Number=C182057, Manufacturer=Citizen, ComponentLink1Description=https://datasheet.ciiva.com/16437/cm315-16437047.pdf?src-supplier=Future+Electronics, ComponentLink1URL=https://datasheet.ciiva.com/16437/cm315-16437047.pdf?src-supplier=Future+Electronics, Item Type=Crystals, Lead Free=5697LeadFree, Manufacturer Part Number=CM315D32768DZFT, Pricing="1=0.5, 10=0.432, 50=0.3892, 100=0.3723, 500=0.3358, 1000=0.32128 (USD)", RoHS=Yes, Stock=343217, Supplier=Digikey
X4: library part X503224MSB4SI, "24MHz Surface Mount Crystal 20pF ±10ppm ±20ppm SMD5032-4P Crystals ROHS", LCSC Part Number=C112587, Manufacturer=YXC, Item Type=Crystal, Manufacturer Part Number=X503224MSB4SI, Pricing="5=0.2572, 50=0.2054, 150=0.1832, 1000=0.1377, 2000=0.1253, 5000=0.1179 (USD)", RoHS=No, Stock=390, Supplier=LCSC

## Free pads (board coordinates)
  rrect13% 0.94x0.44 on Top Overlay: 1(38.115,47.805) 1(45.885,47.805)
  round 1 smd: 2(70.9,74) 2(72.2,74) 2(74.8,74) 2(87,74.05) 2(88.3,74.05) 2(89.6,74)
  rect 3x3 smd: MH1(43.2,2.35) MH2(43.2,7.5) MH3(84.6,7.5) MH4(84.6,2.35)
  rect 3x3 smd far side: MH1(43.2,2.35) MH2(43.2,7.5) MH3(84.6,7.5) MH4(84.6,2.35)
  round 0 hole 3: MH2(2.5,2.5) MH2(2.5,117.5) MH2(107.5,2.5) MH2(107.5,117.5)
  round 5 hole 3: MH2(5,25) MH2(5,95) MH2(105,25) MH2(105,95)

## Via types
v1: diameter 0.6, hole 0.3, Top Layer to Bottom Layer, tented both sides, 475 vias
v2: diameter 0.5, hole 0.3, Top Layer to Bottom Layer, tented both sides, 44 vias

## Nets (pads, with @x,y where several pads share a name; then routed paths per layer and width w, separated by ;. In a path a pad name is that pad's centre, name@x,y a point inside that pad or via, vN(x,y) a via of type N, cw(c..) or ccw(c..) an arc to the next point about the centre after c; other vN are vias at no path point)
1.1V-HUB: C92.2 FB2.1 R67.2 U8.1 U8.18 U8.19 U8.20 | length 7.1
  Top Layer w0.305: R67.2@65.459,32.108 65.459,30.943 ccw(c65.911,30.943) 65.911,30.492 69.775,30.492 ccw(c69.775,30.888) 70.172,30.888 FB2.1@70.172,31.627
3.3V-HUB: C90.2 C91.2 FB1.1 R92.2 R94.2 U8.5 U8.6 U8.7 U8.8 U8.10 U8.11 U10.4 U10.5 | length 0.9
  Top Layer w0.178: 62.019,38.443 62.019,38.45
  Top Layer w0.381: 62.019,38.45 FB1.1@62.868,38.45
  other v1: 61.544,37.77 61.544,38.625
+1.2V: C55.1 C60.2 C61.2 L2.2 R34.1 R47.1 R81.2 | length 96.2
  Top Layer w0.203: R47.1@36.128,106.587 R47.1@36.153,106.613
  Top Layer w0.381: R81.2@35,78.138 38.745,78.138 ccw(c38.745,78.636) 39.243,78.636 v1(39.243,80.304)
  Top Layer w0.508: C55.1@34.732,106.587 R47.1@36.128,106.587 ; R47.1@36.153,106.613 v1(36.153,107.454)
  Layer 2 w1.016: v1(39.243,80.304) 39.243,79.372 ccw(c40.477,79.372) 40.477,78.138 53.982,78.138 cw(c53.982,76.92) 55.2,76.92 v1(55.2,72.271)
  Bottom Layer w0.381: R34.1@54.632,71.703 v1(55.2,72.271)
  Bottom Layer w0.889: v1(36.153,107.454) 55.549,107.454 cw(c55.549,105.994) 57.009,105.994 57.009,97.91 cw(c55.742,97.91) 55.742,96.643 40.638,96.643 ccw(c40.638,95.249) 39.243,95.249 v1(39.243,80.304)
  other v1: 17.813,102.934 17.813,103.829 17.813,104.721 17.813,105.616 17.813,106.508
+1.8V: C73.1 C76.2 C77.2 L4.2 R38.1 R59.2 R80.2 | length 102.2
  Top Layer w0.381: R59.2@41.836,106.613 43.155,106.613 cw(c43.155,105.825) 43.942,105.825 43.942,94.456 ccw(c43.967,94.456) C76.2@43.967,94.431
  Top Layer w0.508: v1(33,77.082) R80.2@33,78.138 ; C73.1@40.416,106.587 R59.2@41.811,106.587
  Layer 2 w1.016: v1@33.007,77.082 33.007,49.012 37.499,44.52 v1(58.167,44.52)
  Bottom Layer w0.381: R38.1@57.412,48.461 57.439,48.434 57.789,48.084 cw(c56.878,47.172) 58.167,47.172 v1(58.167,44.52)
  Bottom Layer w0.889: v1(33,77.082) 43.523,77.082 ccw(c43.523,78.219) 44.659,78.219 44.659,92.392
  other v1: 42.926,92.304 42.926,93.383 42.926,94.463
+3.0V: C88.2 R11.2 R32.1 R79.2 U9.2 | length 116.8
  Top Layer w0.508: R11.2@42.8,27.789 v1(42.8,28.677)
  Top Layer w0.762: R79.2@31,78.138 31,75.998 ccw(c31.861,75.998) 31.861,75.137 41.405,75.137 ccw(c41.405,76.114) 42.382,76.114 42.382,78.636
  Layer 2 w1.016: v1(31,77.082) 31,62.275 21.458,52.733 21.458,35.368 28.15,28.677 v1(42.8,28.677) ; v1@42.367,80.264 56.388,80.264 cw(c56.388,78.177) 58.475,78.177 v1(58.475,69.272)
  Bottom Layer w0.381: v1(58.475,69.272) 59.513,68.234 cw(c59.178,67.899) 59.513,67.564 R32.1@59.094,67.145 R32.1@59.09,67.141
  other v1: 42.367,80.304
+3.3V: C4.2 C7.2 C9.2 C66.1 C67.2 C68.2 C87.2 C93.2 C94.2 C95.2 C140.2 D9.1 J4.10 J4.37 L3.2 LS1.1 R1.2 R8.2 R10.2 R18.1 R19.1 R20.1 R21.1 R28.1 R53.1 R77.2 R120.2 R121.2 U2.3 U2.7 U2.8 U9.3 U11.1 U15.19 | length 62.7
  Top Layer w0.178: v1@2.007,78.25 v1(2.007,78.257)
  Top Layer w0.254: v1@2.007,64.75 J4.10@3.25,64.75 ; v1@2.007,78.25 J4.37@3.25,78.25 ; v1@7.2,56.457 U11.1@7.2,57.7 ; C140.2@50.648,85.084 50.578,85.014 49.867,85.014 49.577,85.304 49.577,86.828 49.858,87.109 U15.19@51.11,87.109 ; R28.1@66.663,63.202 R28.1@66.742,63.282
  Top Layer w0.381: C7.2@36.279,45.265 v1(36.279,50.201) ; C7.2@36.5,45.303 36.538,45.265 U2.7@38.115,45.265 ; v1(50.648,84.081) C140.2@50.648,85.084
  Top Layer w0.508: C95.2@9.1,57.447 v1@9.1,58.613 ; C93.2@10.541,57.63 C93.2@10.541,57.658 v1(10.541,58.613) ; C94.2@12.068,57.658 v1(12.068,58.613) ; v1(13.716,6.815) R121.2@13.716,7.876 ; v1(13.716,16.815) R77.2@13.716,17.876 ; R20.1@16.637,48.438 v1(17.653,48.438) ; v1(27.64,88.119) R53.1@28.335,88.119 ; C66.1@28.33,86.705 28.335,86.71 R53.1@28.335,88.119 ; R53.1@28.34,88.124 R53.1@28.335,88.119 ; U2.8@38.115,43.995 U2.7@38.115,45.265 ; U2.3@45.715,46.535 47.066,46.535 v1(47.066,46.533) ; R10.2@46.438,41.935 v1(47.066,41.935) ; R28.1@66.742,63.282 66.742,63.292 v1(67.267,63.817) 68.131,64.68 cw(c68.959,63.854) 68.959,65.024 v1(93.164,65.024) ; R1.2@103.195,16.18 v1(105.004,16.18)
  Top Layer w0.635: R120.2@26.67,13.587 v1(27.94,13.587) ; LS1.1@96.933,24.015 v1(98.806,24.015)
  Top Layer w0.762: C9.2@2.457,47.793 v1(2.457,48.805)
  Bottom Layer w0.762: C4.2@93.157,62.769 v1@93.157,65.024
  other v1: 7.193,56.457 9.107,58.613 2.007,64.757 42.926,86.995 42.926,88.075 42.926,89.154
+3.8V: C81.2 C82.2 C83.2 C100.1 C101.2 C102.2 C103.2 C105.1 C106.2 C107.2 C108.2 C143.2 D11.1 L5.2 R61.2 R78.2 R97.2 R98.2 R99.2 R114.2 U14.57 U14.58 U14.59 U14.60 | length 206.1
  Top Layer w0.381: R99.2@104.686,89.157 v1@105.494,89.157
  Top Layer w0.508: v1(29,77.082) R78.2@29,78.138 ; D11.1@88.74,115.206 88.799,115.265 C143.2@90.399,115.265 v1(91.516,115.265)
  Top Layer w0.635: v1(26.665,6.815) 26.665,7.825 R97.2@26.716,7.876 ; v1(26.716,16.815) R98.2@26.716,17.876
  Layer 2 w1.016: v1(26.665,6.815) 26.665,27.472 19.6,34.536 19.6,53.611 29,63.011 v1(29,77.082) ; v1(91.516,115.265) 91.516,91.008 ccw(c93.364,91.008) 93.364,89.16 v1(105.497,89.16)
  Bottom Layer w0.762: 67.474,101.457 ccw(c67.585,101.457) 67.585,101.346 89.662,101.346 ccw(c89.662,103.2) 91.516,103.2 v1(91.516,115.265)
  Bottom Layer w0.889: v1(29,77.082) 29,77.73 cw(c30.171,77.73) 30.171,78.901 36.45,78.901 ccw(c36.45,80.05) 37.598,80.05 37.598,95.751 cw(c40.095,95.751) 40.095,98.247 v1(55.601,98.247)
  other v1: 64.024,99.619 65.3,99.619 66.573,99.619 64.024,100.601 65.3,100.601 66.573,100.601
+5V: C50.2 C51.2 C52.2 C57.2 C58.2 C59.2 C78.2 C79.2 C80.2 C89.2 C96.2 C97.2 C104.2 J2.1 L1.2 L6.1 R41.2 R62.1 R69.2 R70.2 R71.2 R72.2 R82.2 R88.1 R96.2 U6.12 U6.13 U6.28 U6.29 U7.1 U10.1 U10.2 U12.2 | length 31.1
  Top Layer w0.178: 57.676,112.571 57.676,114.73 cw(c58.16,114.73) 58.16,115.214 62.509,115.214 cw(c62.509,114.827) 62.897,114.827 R62.1@62.897,113.333
  Top Layer w0.381: v1@65.27,83.75 R96.2@66.078,83.75
  Top Layer w0.508: v1(12.6,107.654) R41.2@13.601,107.654 ; R88.1@70.947,49.663 ccw(c70.947,49.688) 70.972,49.688 70.972,50.504 cw(c71.471,50.504) 71.471,51.003 v1(72.439,51.003)
  Layer 2 w0.508: v1(12.6,107.654) 11.684,106.738 11.684,96.312 12.467,95.529 v1@16.978,95.529
  other v1: 47.238,37.244 48.26,37.244 47.238,38.227 48.26,38.227 77.027,52.395 77.027,53.377 78.049,53.377 79.068,53.377 65.267,83.746 16.978,94.496 18.254,94.496 19.527,94.496 35.347,95.365 16.978,95.479 18.254,95.479 19.527,95.479 34.752,95.965 58.462,115.57 59.738,115.57 61.011,115.57 58.462,116.553 59.738,116.553 61.011,116.553
+5VUSB: C23.2 C24.2 J3.1 U4.16 | length 9.9
  Top Layer w0.381: C23.2@23.341,49.124 C24.2@24.621,49.124 29.926,49.124 cw(c29.926,48.501) 30.548,48.501 J3.1@30.548,46.149
+EXT: C139.2 R102.2 R103.2 R111.2 U14.7 U15.2 | length 87.4
  Top Layer w0.305: 55.172,86.619 cw(c55.662,86.619) 55.662,87.109 ; 55.172,87.599 ccw(c55.662,87.599) 55.662,87.109 ; U15.2@56.71,87.109 55.662,87.109
  Top Layer w0.381: R102.2@55.172,93.684 55.172,86.619 55.172,85.109 ccw(c55.197,85.109) C139.2@55.197,85.084 ; v1@55.173,84.081 C139.2@55.173,85.1
  Top Layer w0.508: C139.2@55.165,85.108 C139.2@55.173,85.1 ; v1@55.173,84.081 v1(55.181,84.072) ; U14.7@78.7,76.25 v1(78.7,74) 78.7,72.239 ccw(c79.455,72.239) 79.455,71.484 105.139,71.484 ccw(c105.139,72.578) 106.233,72.578 106.233,79.705 ccw(c104.738,79.705) R103.2@104.738,81.2
  Bottom Layer w0.508: v1(55.181,84.072) 55.181,77.64 ccw(c55.804,77.64) 55.804,77.018 78.116,77.018 cw(c78.116,76.434) 78.7,76.434 v1(78.7,74)
+USIM: J2.4 J2.5 U14.14 | length 34.3
  Top Layer w0.635: v1(90.9,74) U14.14@90.9,76.25
  Top Layer w0.762: v1(81.999,54.114) v1(84.499,54.114)
  Bottom Layer w0.508: v1(84.499,54.114) 84.499,75.263 cw(c85.132,75.263) 85.132,75.895 90.26,75.895 cw(c90.26,75.255) 90.9,75.255 v1(90.9,74)
A_MASTER: 
AGND: C19.1 C20.1 C21.1 C22.1 R31.1 R37.1 U1.116 | length 7
  Top Layer w0.178: R31.1@59.69,70.519 R31.1@59.749,70.519
  Top Layer w0.229: U1.116@59.404,66.397 61.651,68.644
  Top Layer w0.381: R31.1@59.749,70.519 R37.1@60.399,71.169
  Bottom Layer w0.508: C20.1@60.441,66.857 v1@62.428,68.845
  other v1: 62.435,68.845
ANT_DIV: C142.2 R109.2 U14.35 | length 3.4
  Top Layer w0.178: U14.35@97.75,103.25 cw(c97.775,103.25) U14.35@97.775,103.275
  Top Layer w0.343: U14.35@97.775,103.275 R109.2@101.13,103.275
ANT_GNSS: C146.2 R113.2 U14.47 | length 3.3
  Top Layer w0.178: U14.47@83.092,107.758 U14.47@83.1,107.75
  Top Layer w0.343: U14.47@83.092,107.758 R113.2@83.092,111.03
ANT_MAIN: C138.2 R101.2 U14.49 | length 3.3
  Top Layer w0.343: R101.2@77.383,111.03 77.383,107.767 U14.49@77.4,107.75
AP_RDY: pad.2@72.2,74 U14.2 | length 2.3